# Altium PCB lighting_control_board.PcbDoc
Units mil, origin at the board's own origin, x right, y up, seen from the top; angles counter-clockwise.
Board outline 5435 x 1925 mil, 4 copper layers (Top Layer, Layer 1, Layer 2, Bottom Layer), stack 22.378 mil thick; 43 components, 29 nets, 207 pads, 19 vias.
Unrouted connection lines stored in the file: 30.
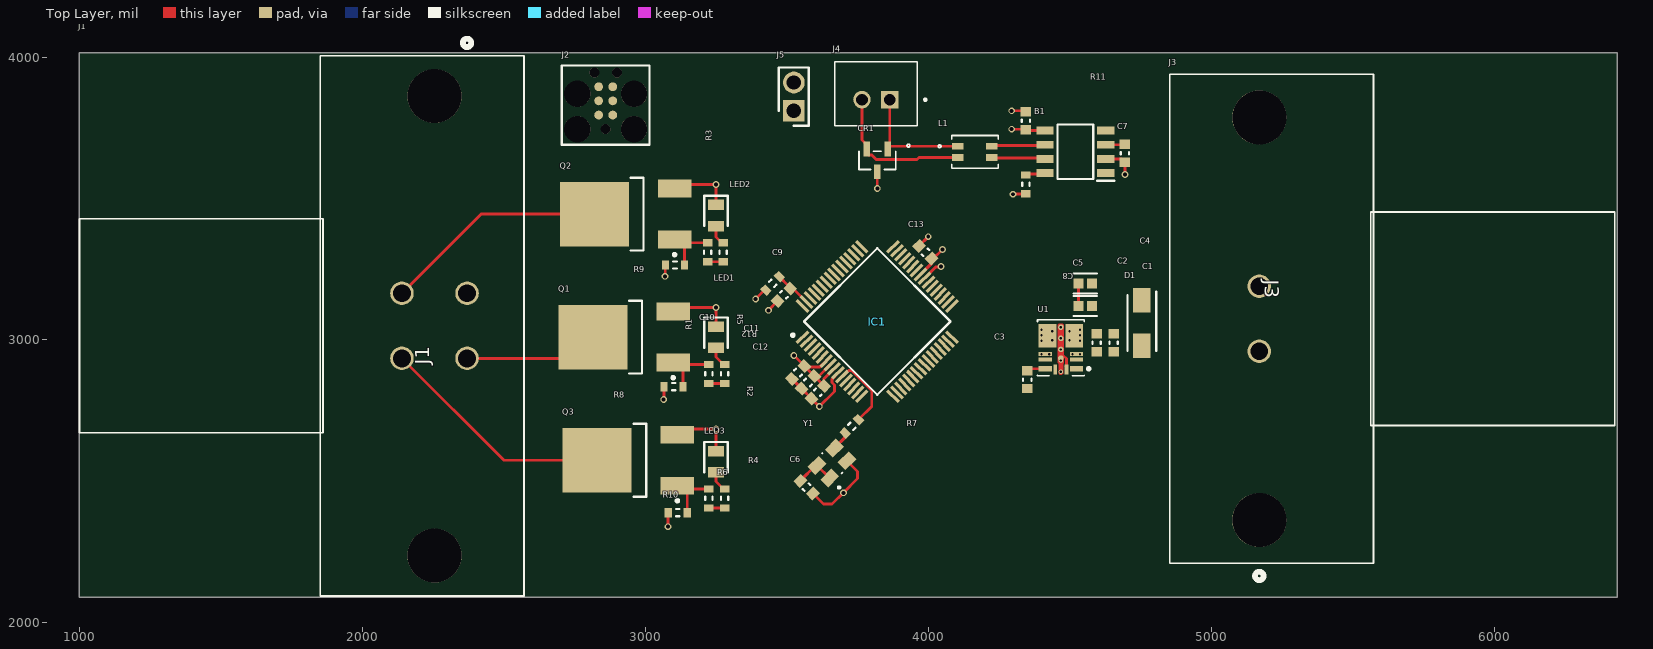
[diagram p0: Top Layer view]
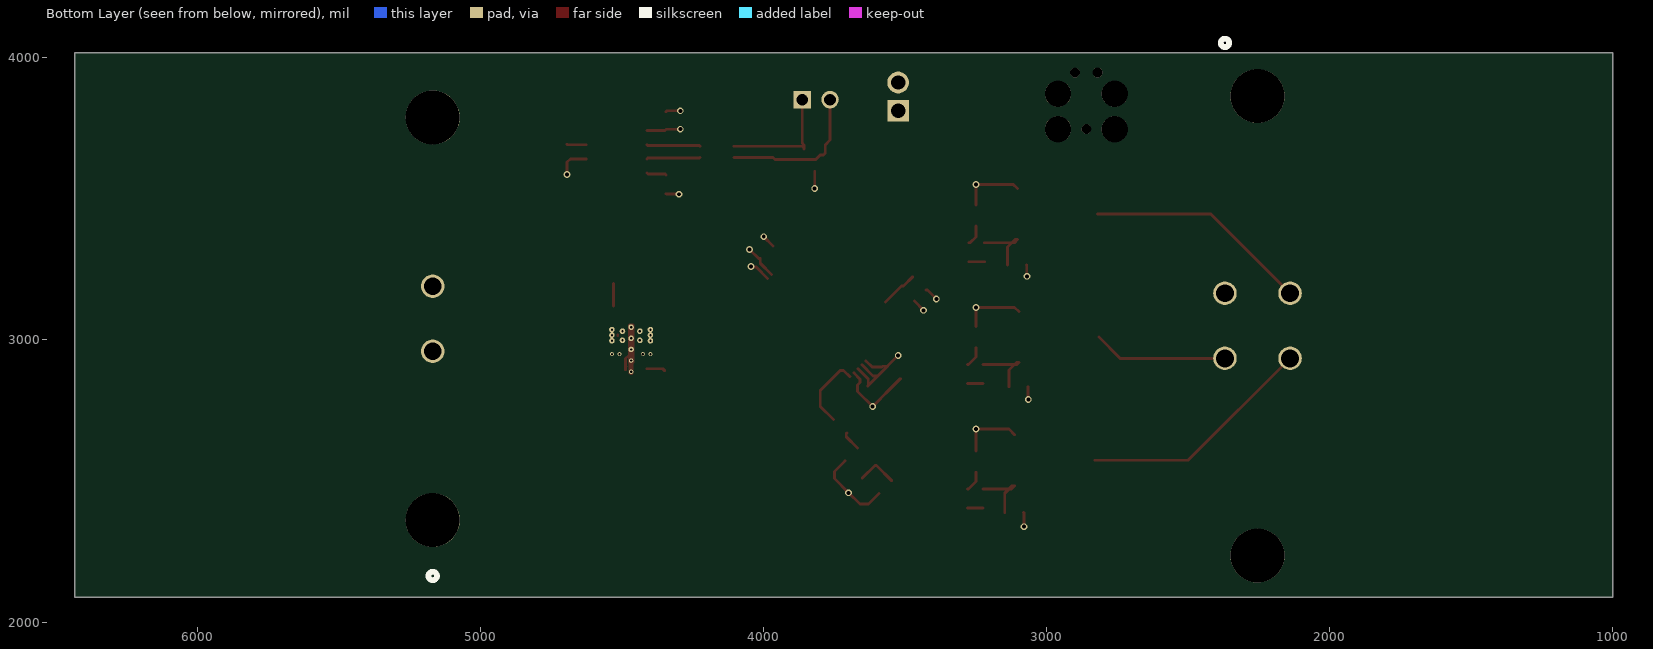
[diagram p1: Bottom Layer view, seen from below]
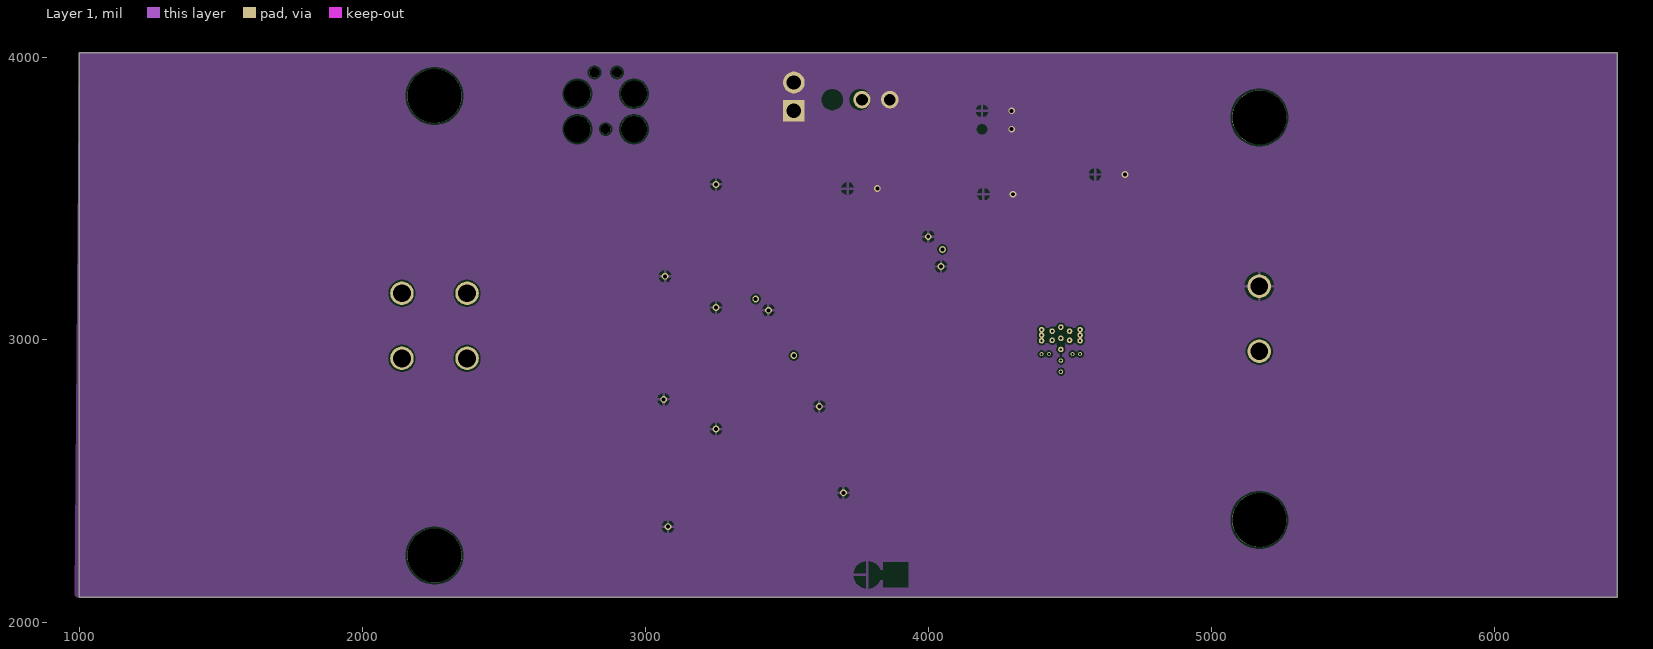
[diagram p2: Layer 1]
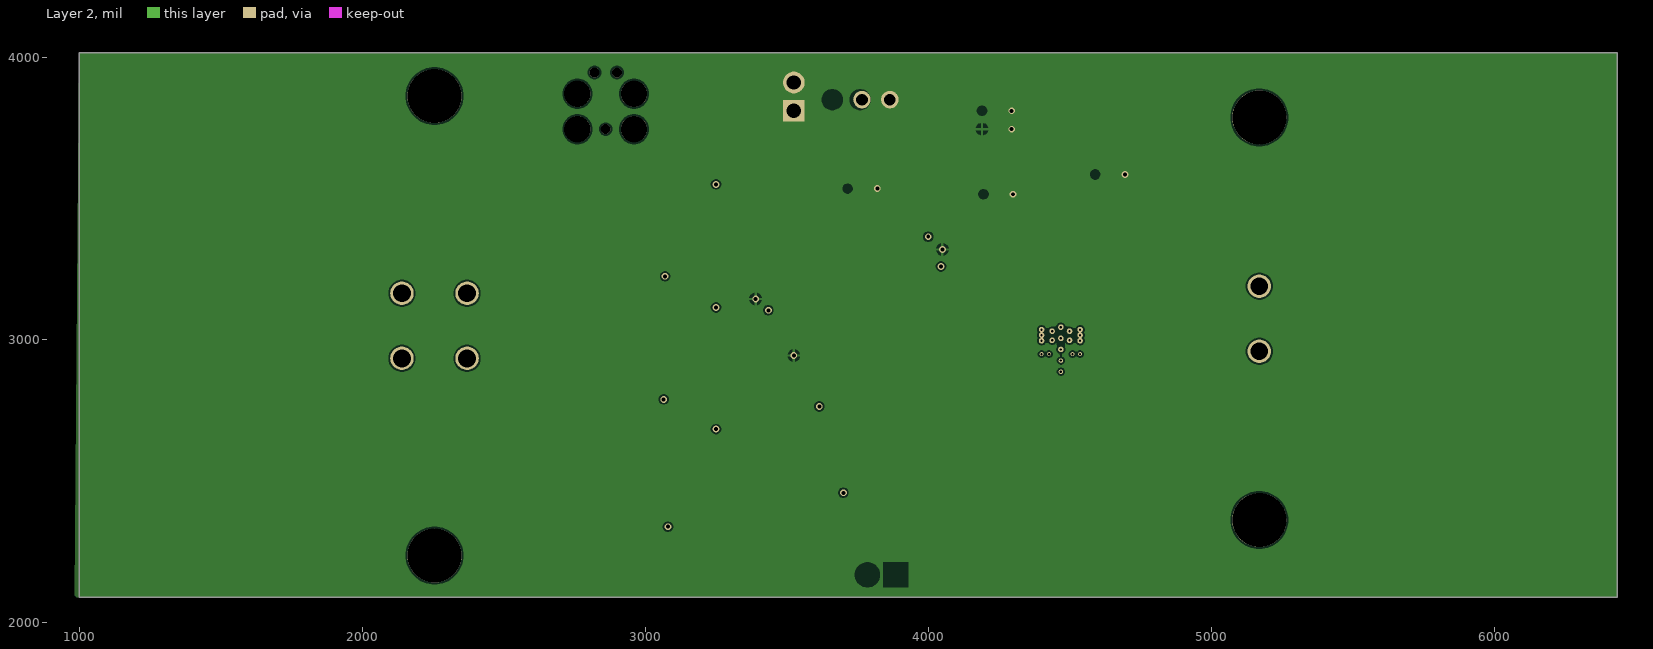
[diagram p3: Layer 2]
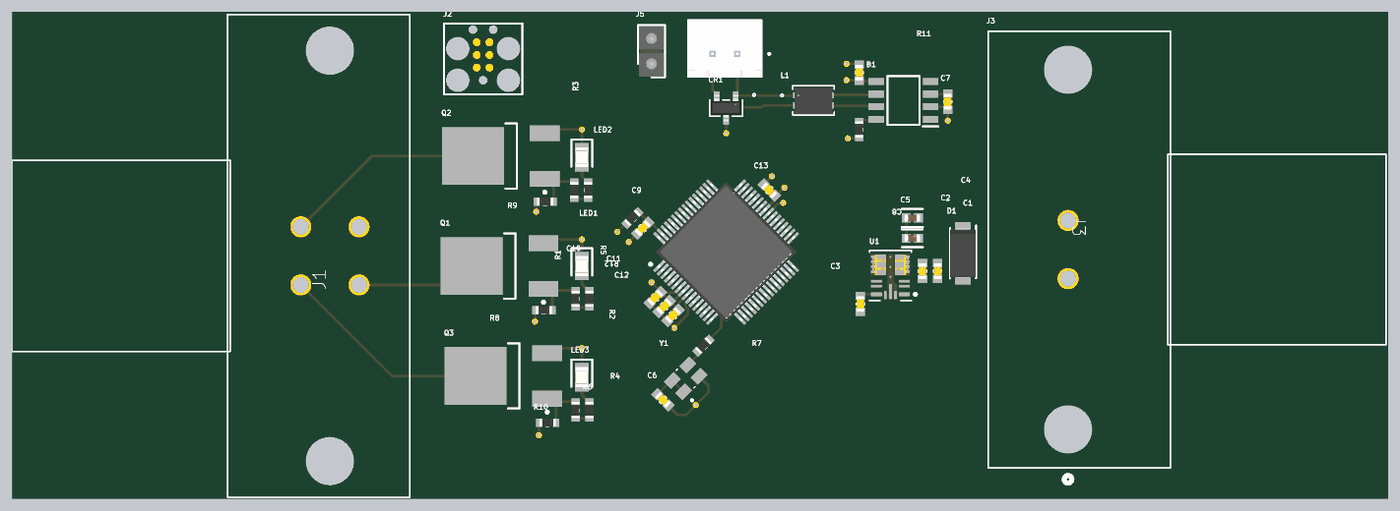
[diagram p4: 3D render of the assembled board from above, using the file's embedded part models]

## Layer stack, top to bottom
Top Solder: solder mask 0.4, Solder Resist, Dk 3.5
Top Layer: signal copper 1.4
Dielectric 2: prepreg 2.8, PP-006, Dk 4.1
Layer 1: signal copper 0.689
Dielectric 1: dielectric 12.6, FR-4, Dk 4.8
Layer 2: signal copper 0.689
Dielectric 3: prepreg 2.8, PP-006, Dk 4.1
Bottom Layer: signal copper 1.4
Bottom Solder: solder mask 0.4, Solder Resist, Dk 3.5

## Board outline
1000,2090 6435,2090 6435,4015 1000,4015

## Design rules (kind name [scope] priority, off if disabled: settings)
BoardOutlineClearance [All] p1: gap=0 ignorepadtopadclearanceinfootprint=FALSE
Clearance [All] p1: gap=6 ignorepadtopadclearanceinfootprint=FALSE
PolygonConnect [All] p1: connectstyle=Relief reliefconductorwidth=10 reliefentries=4 polygonreliefangle="90 Angle" airgapwidth=10
RoutingVias [All] p1: holewidth=14 width=24 viastyle="Through Hole" minholewidth=10 minwidth=20 maxholewidth=28 maxwidth=50
SolderMaskExpansion [All] p1: expansion=0 istentingtop=FALSE
SupplyNets "Schematic Supply Nets_5" [InNet('FAULT_GND')] p1: voltage=0.000
SupplyNets "Schematic Supply Nets_4" [InNet('+3V3')] p2: voltage=0.000
SupplyNets "Schematic Supply Nets_3" [InNet('+5V')] p3: voltage=0.000
SupplyNets "Schematic Supply Nets_2" [InNet('GND')] p4: voltage=0.000
SupplyNets "Schematic Supply Nets_1" [InNet('RTS_GND')] p5: voltage=0.000
SupplyNets "Schematic Supply Nets" [InNet('LTS_GND')] p6: voltage=0.000
Width [All] p1: maxlimit=10 minlimit=10 preferedwidth=10
30 further rules are at their usual default settings.

## Components (designator, comment, footprint, x,y, rotation, side; value= is the part's Value field where it differs from the comment)
B1 "TJA1044VT_3Z" SOIC127P600X175-8N 4520,3665 r180 top
C1 "4.7 uF" CAP_0603 4595,2990 r270 top
C2 "100 nF" CAP_0603 4655,2990 r270 top
C3 "1 uF" CAP_0603 4350,2860 r90 top
C4 "22 uF" FP-GRM188-0_2-IPC_C 4555,3120 r0 top
C5 "22 uF" FP-GRM188-0_2-IPC_C 4555,3200 r0 top
C6 "100 nF" CAP_0603 3570,2480 r315 top
C7 "100 nF" CAP_0603 4695,3660 r90 top
C8 "100 nF" CAP_0603 4345,3775 r270 top
C9 "100 nF" CAP_0603 3490,3160 r225 top
C10 "100 nF" CAP_0603 3540,2885 r225 top
C11 "100 nF" CAP_0603 3575,2850 r225 top
C12 "100 nF" CAP_0603 3610,2815 r225 top
C13 "100 nF" CAP_0603 3990,3310 r135 top
CR1 "ESD2CAN24DBZRQ1" SOT-23_DBZ_TEX 3820,3635 r180 top
D1 "SMAJ5.0A" DIOM5026X229N 4755,3060 r270 top
IC1 "FS32K142HAT0MLHT" QFP50P1200X1200X160-64N 3820,3065 r45 top
J1 "194270032" CONN_SD-19427-020_MOL 2370,3165 r90 top
J2 "Tag-Connect" TC2030-MCP 2860,3745 r90 top
J3 "194270040" CONN_SD-19427-018_MOL 5170,2960 r270 top
J4 "B2B-XH-A(LF)(SN)" JST_B2B-XH-A(LF)(SN) 3815,3870 r0 top
J5 "710-61300211121" HDRV2W110P0X254_1X2_508X254X854P 3525,3810 r90 top
L1 "Choke" ACT1210_TDK 4165,3665 r0 top
LED1 "Green" LEDC2012X90N 3250,3010 r270 top
LED2 "Green" LEDC2012X90N 3250,3440 r270 top
LED3 "White" LEDC2012X90N 3250,2570 r270 top
Q1 "NTD24N06LT4G" ONSC-DPAK-3-369C-01_V 2925.24,3010 r180 top
Q2 "NTD24N06LT4G" ONSC-DPAK-3-369C-01_V 2930.24,3445 r180 top
Q3 "NTD24N06LT4G" ONSC-DPAK-3-369C-01_V 2940.24,2575 r180 top
R1 "100Ω" RES_0603 3225,2880 r90 top
R2 "1KΩ" RES_0603 3280,2880 r270 top
R3 "100Ω" RES_0603 3220,3310 r90 top
R4 "100Ω" RES_0603 3225,2440 r90 top
R5 "1KΩ" RES_0603 3275,3310 r270 top
R6 "1KΩ" RES_0603 3280,2440 r270 top
R7 "22Ω" RES_0603 3730,2695 r45 top
R8 "10KΩ" RES_0603 3100,2835 r0 top
R9 "10KΩ" RES_0603 3105,3265 r0 top
R10 "10KΩ" RES_0603 3115,2390 r0 top
R11 "10KΩ" RES_0603 4345,3550 r90 top
R12 "10KΩ" RES_0603 3450,3200 r225 top
U1 "TPSM33620S5QRDNRQ1" RDN0011B-MFG 4468.66,2975.59 r180 top
Y1 "ASEAIG-40.000MHZ-C-S-T" XTAL_ASEAIG-40.000MHZ-C-S-T 3660,2565 r135 top

## Footprints (in the part's own frame and the unit in brackets; to place one, negate y for a bottom-side part, rotate by r counter-clockwise, add the part's x,y. Pads: shape width x height; smd on the part's side, far side on the other; paste and mask are expansions set on the pad)
ACT1210_TDK [mil]
  rect 41x24 smd paste+0 mask+0: 1(-60.04,19.68) 2(-60.04,-19.68) 3(60.04,-19.68) 4(60.04,19.68)
  silkscreen extent -130,-58 82,58, body extent -77,-53 77,53, height 98
CAP_0603 [mm] "0603 Generic Capacitor"
  rect 0.85x0.95 smd: 1(-0.8,0) 2(0.8,0)
  silkscreen extent -0.1,-0.38 0.1,0.38, body extent -0.8,-0.4 0.8,0.4, height 0.8
CONN_SD-19427-018_MOL [mil]
  round 83 hole 63 paste-99999 mask+0: 1(0,0) 2(-230,0)
  round 191 hole 191 unplated paste-99999 mask+0: 3(-826.5,0) 4(596.5,0)
  silkscreen extent -979,-316 809,1256
CONN_SD-19427-020_MOL [mil]
  round 83 hole 63 paste-99999 mask+0: 1(0,0) 2(-230,0) 3(0,230) 4(-230,230)
  round 191 hole 191 unplated paste-99999 mask+0: 5(-927,115) 6(697,115)
  silkscreen extent -1070,-201 900,1370
DIOM5026X229N [mm]
  rect 2.2x1.55 smd: 1(-2.05,0) 2(2.05,0)
  silkscreen extent -2.83,-1.3 2.52,1.3, body extent -2.52,-1.3 2.52,1.3, height 2.29
FP-GRM188-0_2-IPC_C [mil]
  rect 35.63x35.68 smd paste+0 mask+0: 1(-23.64,0) 2(23.64,0)
  silkscreen extent -41,-35 41,35, body extent -45,-24 45,24, height 10
HDRV2W110P0X254_1X2_508X254X854P [mm]
  rect 1.95x1.95 hole 1.3: 1(0,0)
  round 1.95 hole 1.3: 2(2.54,0)
  silkscreen extent -1.35,-1.35 3.89,1.35, body extent -1.27,-1.27 3.81,1.27, height 8.54
JST_B2B-XH-A(LF)(SN) [mm]
  rect 1.575x1.575 / inner round 1.575 / far side rect 1.575x1.575 hole 1.05: 1(1.25,-0.525)
  round 1.575 hole 1.05: 2(-1.25,-0.525)
  silkscreen extent -3.7,-2.88 4.54,2.88, body extent -3.7,-2.88 3.7,2.88, height 7
LEDC2012X90N [mm]
  rect 0.95x1.4 smd: 1(-0.95,0) 2(0.95,0)
  silkscreen extent -1.78,-1.05 0.95,1.05, body extent -1,-0.62 1,0.63, height 0.82
ONSC-DPAK-3-369C-01_V [mm] "DPAK, 3-Leads, Body 6.54x6.095mm, Pitch 2.29mm"
  rect 3x1.6 smd: 1(-4.4,2.29) 3(-4.4,-2.29)
  rect 6.2x5.8 smd: 4(2.8,0)
  silkscreen extent -4.53,-3.27 -0.45,3.76, body extent -1.6,-3.27 4.49,3.27, height 2.38
QFP50P1200X1200X160-64N [mm]
  rect 1.475x0.3 smd: 1(-5.738,3.75) 2(-5.738,3.25) 3(-5.738,2.75) 4(-5.738,2.25) 5(-5.738,1.75) 6(-5.738,1.25) 7(-5.738,0.75) 8(-5.738,0.25) 9(-5.738,-0.25) 10(-5.738,-0.75) 11(-5.738,-1.25) 12(-5.738,-1.75) 13(-5.738,-2.25) 14(-5.738,-2.75) 15(-5.738,-3.25) 16(-5.738,-3.75) 33(5.738,-3.75) 34(5.738,-3.25) 35(5.738,-2.75) 36(5.738,-2.25) 37(5.738,-1.75) 38(5.738,-1.25) 39(5.738,-0.75) 40(5.738,-0.25) 41(5.738,0.25) 42(5.738,0.75) 43(5.738,1.25) 44(5.738,1.75) 45(5.738,2.25) 46(5.738,2.75) 47(5.738,3.25) 48(5.738,3.75)
  rect 0.3x1.475 smd: 17(-3.75,-5.738) 18(-3.25,-5.738) 19(-2.75,-5.738) 20(-2.25,-5.738) 21(-1.75,-5.738) 22(-1.25,-5.738) 23(-0.75,-5.738) 24(-0.25,-5.738) 25(0.25,-5.738) 26(0.75,-5.738) 27(1.25,-5.738) 28(1.75,-5.738) 29(2.25,-5.738) 30(2.75,-5.738) 31(3.25,-5.738) 32(3.75,-5.738) 49(3.75,5.738) 50(3.25,5.738) 51(2.75,5.738) 52(2.25,5.738) 53(1.75,5.738) 54(1.25,5.738) 55(0.75,5.738) 56(0.25,5.738) 57(-0.25,5.738) 58(-0.75,5.738) 59(-1.25,5.738) 60(-1.75,5.738) 61(-2.25,5.738) 62(-2.75,5.738) 63(-3.25,5.738) 64(-3.75,5.738)
  silkscreen extent -6.35,-4.65 4.65,4.65, body extent -6,-6 6,6, height 1.6
RDN0011B-MFG [mm]
  rect 1.2x0.475 smd paste-0.587 mask-0.584: 1(-1.4,1.962) 8(1.4,1.962)
  rect 1.2x0.35 smd paste-0.587 mask-0.584: 2(-1.4,1.15) 3(-1.4,0.65) 6(1.4,0.65) 7(1.4,1.15)
  rect 1.6x2.15 smd paste-1.062 mask-1.067: 4(-1.2,-1) 5(1.2,-1)
  rect 0.35x0.9 smd paste-0.437 mask-0.432: 9(0.5,2.05) 11(-0.5,2.05)
  round 0.504 smd paste-0.239 mask-0.241: 10(0,1.005)
  round 0.35 hole 0.203 paste-2539.97 mask-0.165: 12(-1.05,0.65) 13(-1.73,0.65) 24(1.05,0.65) 25(1.73,0.65)
  round 0.5 hole 0.203 paste-2539.97 mask-0.241: 14(-0.78,-1.41) 15(-0.78,-0.59) 16(-1.73,-1.55) 17(-1.73,-1.05) 18(-1.73,-0.55) 21(0,0.23) 22(0,-0.77) 23(0,-1.77) 26(0.78,-0.59) 27(0.78,-1.41) 28(1.73,-0.55) 29(1.73,-1.05) 30(1.73,-1.55)
  round 0.4 hole 0.203 paste-2539.97 mask-0.191: 19(0,2.23) 20(0,1.23)
  Top Layer region: -0.2,1.515 -0.2,2.4 -0.1,2.5 0.1,2.5 0.2,2.4 0.2,1.515 0.24,1.475 0.24,1.475 0.28,1.435 0.28,-1.975 0.18,-2.075 -0.18,-2.075 -0.28,-1.975 -0.28,1.435 -0.24,1.475 -0.24,1.475
  silkscreen extent -2.63,-2.42 2.1,2.6
RES_0603 [mm] "0603 Generic Resistor"
  rect 0.65x0.85 smd: 1(-0.85,0) 2(0.85,0)
  silkscreen extent -0.15,-0.33 0.15,0.33, body extent -0.8,-0.4 0.8,0.4, height 0.45
SOIC127P600X175-8N [mm]
  rect 1.55x0.7 smd: 1(-2.725,1.905) 2(-2.725,0.635) 3(-2.725,-0.635) 4(-2.725,-1.905) 5(2.725,-1.905) 6(2.725,-0.635) 7(2.725,0.635) 8(2.725,1.905)
  silkscreen extent -3.5,-2.45 1.6,2.61
SOT-23_DBZ_TEX [mil]
  rect 22.36x51.56 smd paste+0 mask+0: 1(-37.4,-40) 2(37.4,-40) 3(0,40)
  silkscreen extent -115,-57 65,33, body extent -60,-52 60,52, height 44
TC2030-MCP [mil]
  round 31 smd paste-99999: 1(50,-25) 2(50,25) 3(100,-25) 4(100,25) 5(150,-25) 6(150,25)
  round 34 hole 35 unplated: A(0,0) B(200,40) C(200,-40)
  round 92 hole 93 unplated: D(0,-100) E(125,-100) F(0,100) G(125,100)
  silkscreen extent -55,-155 225,155
XTAL_ASEAIG-40.000MHZ-C-S-T [mm]
  rect 1x1.4 smd: 1(-0.8,1.1) 2(-0.8,-1.1) 3(0.8,-1.1) 4(0.8,1.1)
  silkscreen extent -2.1,-0.08 1.25,1.2

## Part data
B1: "CAN Interface IC HS-CAN Transceivers High-speed CAN transceiver with Standby mode", Manufacturer_Name=NXP, Manufacturer_Part_Number=TJA1044VT/3Z, Mouser Part Number=771-TJA1044VT/3Z, Datasheet Link=http://www.nxp.com/docs/en/data-sheet/TJA1044V.pdf, Geometry.Height=1.75mm, Mouser Price/Stock=https://www.mouser.co.uk/ProductDetail/NXP-Semiconductors/TJA1044VT-3Z?qs=wUXugUrL1qwONZrxXTzMPQ%3D%3D
C1: library part "4.7 uF Capacitor, 0603", "Multilayer Ceramic Capacitors MLCC - SMD/SMT KGM15BR71H224JT NEW GLOBAL PN 50V 0.22uF A 581-KGM15BR71H224JT", Manufacturer 1="KYOCERA AVX", Manufacturer Part Number 1=06033D475KAT2A, MPN=581-06033D475KAT2A, Package=0603, Tolerance=10%, Voltage="25 V", Design Item ID="4.7 uF Capacitor, 0603", Library Ref=Capacitor_BASE, Supplier 1=Mouser
C2 C6 C7 C8 C9 C10 C11 C12 C13: library part "100 nF Capacitor, 0603", "Multilayer Ceramic Capacitors MLCC - SMD/SMT KGM15BR71H104JT NEW GLOBAL PN 50V 0.1uF A 581-KGM15BR71H104JT", Manufacturer 1="KYOCERA AVX", Manufacturer Part Number 1=06035C104JAT2A, MPN=581-06035C104JAT2A, Package=0603, Tolerance=5%, Voltage="50 V", Design Item ID="100 nF Capacitor, 0603", Library Ref=Capacitor_BASE, Supplier 1=Mouser
C3: library part "1 uF Capacitor, 0603", "Multilayer Ceramic Capacitors MLCC - SMD/SMT KGM15BR71H224JT NEW GLOBAL PN 50V 0.22uF A 581-KGM15BR71H224JT", Manufacturer 1="KYOCERA AVX", Manufacturer Part Number 1=06033C105KAT2A, MPN=581-06033C105KAT2A, Package=0603, Tolerance=10%, Voltage="25 V", Design Item ID="1 uF Capacitor, 0603", Library Ref=Capacitor_BASE, Supplier 1=Mouser
C4 C5: library part CMP-2000-06337-3, "Chip Multilayer Ceramic Capacitors for General Purpose, 0603, 22uF, X5R, 15%, 20%, 10V", Capacitance=22uF, Case Code (Imperial)=0603, Case Code (Metric)=1608, Dielectric=X5R, Max Operating Temperature=85°C, Min Operating Temperature=-55°C, Package Quantity=4000, Tolerance=20%, Voltage Rating=10V, Case/Package=0603, Depth=0.8mm, Height=0.8mm, Lead Free="Lead Free", Length=1.6mm, Material=Ceramic, Mount="Surface Mount", Packaging="Tape and Reel", REACH SVHC="No SVHC", Termination=SMD/SMT, Thickness=0.039inch, Voltage Rating (DC)=10V, Weight=0.000222oz, Width=0.8mm
CR1: "Automotive, dual, 3-pF, Â±24-V, Â±30-kV ESD protection diode for in-vehicle networks 3-SOT-23 -55 to 150", Manufacturer_Name="Texas Instruments", Copyright="Copyright (C) 2026 Ultra Librarian. All rights reserved.", Manufacturer_Part_Number=ESD2CAN24DBZRQ1, RefDes=RefDes, Type=Type
D1: "TVS +5 V rail", Manufacturer_Name=LITTELFUSE, Mouser Part Number=576-SMAJ5.0A, Arrow Part Number=SMAJ5.0A, Arrow Price/Stock=https://www.arrow.com/en/products/smaj5-0a_12/littelfuse.html?utm_currency=USD&region=nac, Datasheet Link=https://www.littelfuse.com/~/media/electronics/datasheets/tvs_diodes/littelfuse_tvs_diode_smaj_datasheet.pdf.pdf, Height=2.29mm, Manufacturer_Part_Number=SMAJ5.0A, Mouser Price/Stock=https://www.mouser.co.uk/ProductDetail/Littelfuse/SMAJ5.0A?qs=2VFNtWizgicfetZVA4gWHA%3D%3D
IC1: "Integrated Circuit", Manufacturer_Name=NXP, Mouser Part Number=771-FS32K142HAT0MLHT, Arrow Part Number=FS32K142HAT0MLHT, Arrow Price/Stock=https://www.arrow.com/en/products/fs32k142hat0mlht/nxp-semiconductors?region=nac, Datasheet Link=https://datasheet.datasheetarchive.com/originals/distributors/DKDS42/DSANUWW0047967.pdf, Height=1.6mm, Manufacturer_Part_Number=FS32K142HAT0MLHT, Mouser Price/Stock=https://www.mouser.co.uk/ProductDetail/NXP-Semiconductors/FS32K142HAT0MLHT?qs=W0yvOO0ixfHOt6NwcnDRUQ%3D%3D
J1: "5.84mm Pitch MX150L Right-Angle PCB Header, Dual Row, without PCB Flange, Tin Plated, 4 Circuits", Manufacturer_Name="Molex Connector Corporation", Copyright="Copyright (C) 2026 Ultra Librarian. All rights reserved.", Manufacturer_Part_Number=194270032, RefDes=RefDes, Type=Type
J2: "Tag-Connect Programming Connector"
J3: "5.84mm Pitch MX150L Right-Angle PCB Header, Single Row, without PCB Flange, Tin Plated, 2 Circuits", Manufacturer_Name="Molex Connector Corporation", Copyright="Copyright (C) 2026 Ultra Librarian. All rights reserved.", Manufacturer_Part_Number=194270040, RefDes=RefDes, Type=Type
J4: "Connector Header Through Hole 2 position 0.098 (2.50mm)", Package=None, Check_prices=https://www.snapeda.com/parts/B2B-XH-A(LF)(SN)/JST/view-part/?ref=eda, MF="JST Sales", MP=B2B-XH-A(LF)(SN), SnapEDA_Link=https://www.snapeda.com/parts/B2B-XH-A(LF)(SN)/JST/view-part/?ref=snap
J5: library part 61300211121, "2-Pin Header", Manufacturer_Name="Wurth Elektronik", Datasheet Link=https://www.we-online.com/components/products/datasheet/61300211121.pdf, Manufacturer_Part_Number=61300211121, Supplier 1=Mouser, Supplier Part Number 1=710-61300211121
L1: library part ACT1210D-101-2P-TL00, "Description", Manufacturer_Name=TDK, Copyright="Copyright (C) 2025 Ultra Librarian. All rights reserved.", Manufacturer_Part_Number=ACT1210D-101-2P-TL00, Type="Common Mode Chokes"
LED1 LED2: library part HSMW-C170-U0000_2, "LED Green", Manufacturer_Name="Avago Technologies", Manufacturer_Part_Number=HSMW-C170-U0000, Supplier Part Number 1=630-HSMQ-C170-T0000, Datasheet Link=https://componentsearchengine.com/Datasheets/2/HSMW-C170-U0000.pdf, Supplier 1=Mouser
LED3: library part HSMW-C170-U0000_3, "LED White", Manufacturer_Name="Avago Technologies", Manufacturer_Part_Number=HSMW-C170-U0000, Supplier Part Number 1=630-HSMW-C170-U0000, Datasheet Link=https://componentsearchengine.com/Datasheets/2/HSMW-C170-U0000.pdf, Supplier 1=Mouser
Q1 Q2 Q3: library part CMP-1058-00417-1, "Power MOSFET, 24 A, 60 V, Logic Level, N-Channel, 3-Pin DPAK, Pb-Free, Tape and Reel", Manufacturer="On Semiconductor", Package Type=DPAK-3, Channel Polarity="N Channel", Ciss Typ (pF)=814, ComponentLink1Description="Manufacturer URL", ComponentLink1URL=http://www.onsemi.com/, ComponentLink2Description=Datasheet, ComponentLink2URL=http://www.onsemi.cn/pub_link/Collateral/NTD24N06L-D.PDF, ComponentLink3Description="Package Specification", ComponentLink3URL=http://www.onsemi.cn/pub_link/Collateral/369C.PDF, Configuration=Single, Coss Typ (pF)=258, Crss Typ (pF)=80, DatasheetVersion="Rev. 3", Mounting Technology="Surface Mount", PackageDescription="3-Pin Flange Mount, Body 6.54 x 6.095 mm, Pitch 2.29 mm", PackageReference=DPAK-3-369C-01, PackageVersion="Rev. E, 02/2014", Packing="Tape and Reel", PartNumber=NTD24N06LT4G, Qrr Typ (nC)=84, RoHS=Pb-Free, V(BR)DSS Min (V)=60, VGS(th) Max (V)=2
R1 R3 R4: library part "100 Ohm Resistor", "Thick Film Resistors - SMD General Purpose Chip Resistor 0603, 100Ohms, 1%, 1/10W", Manufacturer 1=YAGEO, Manufacturer Part Number 1=RC0603FR-07100RL, MPN=603-RC0603FR-07100RL, Package=0603, Power=0.1W, Tolerance=0.01, Design Item ID="100 Ohm Resistor", Library Ref=Resistor_BASE, Supplier 1=Mouser
R2 R5 R6: library part "1 KOhm Resistor", "Thick Film Resistors - SMD General Purpose Chip Resistor 0603, 1kOhms, 1%, 1/10W", Manufacturer 1=YAGEO, Manufacturer Part Number 1=RC0603FR-071KL, MPN=603-RC0603FR-071KL, Package=0603, Power=0.1W, Tolerance=0.01, Design Item ID="1 KOhm Resistor", Library Ref=Resistor_BASE, Supplier 1=Mouser
R7: library part "22 Ohm Resistor", "Thick Film Resistors - SMD General Purpose Chip Resistor 0603, 22Ohms, 1%, 1/10W", Manufacturer 1=YAGEO, Manufacturer Part Number 1=RC0603FR-0722RL, MPN=603-RC0603FR-0722RL, Package=0603, Power=0.1W, Tolerance=0.01, Design Item ID="22 Ohm Resistor", Library Ref=Resistor_BASE, Supplier 1=Mouser
R8 R9 R10 R11 R12: library part "10 KOhm Resistor", "Thick Film Resistors - SMD General Purpose Chip Resistor 0603, 10kOhms, 1%, 1/10W", Manufacturer 1=YAGEO, Manufacturer Part Number 1=RC0603FR-0710KL, MPN=603-RC0603FR-0710KL, Package=0603, Power=0.1W, Tolerance=0.01, Design Item ID="10 KOhm Resistor", Library Ref=Resistor_BASE, Supplier 1=Mouser
U1: "Automotive, 3V to 36V input, 2A synchronous buck module 11-QFN-FCMOD -40 to 150", Manufacturer_Name="Texas Instruments", Copyright="Copyright (C) 2026 Ultra Librarian. All rights reserved.", Manufacturer_Part_Number=TPSM33620S5QRDNRQ1, RefDes=RefDes, Type=TYPE
Y1: "40 MHz XO (Standard) CMOS Oscillator 3.3V Enable/Disable 4-SMD, No Lead", Package=None, Check_prices=https://www.snapeda.com/parts/ASEAIG-40.000MHZ-C-S-T/Abracon+LLC/view-part/?ref=eda, MF="Abracon LLC", MP=ASEAIG-40.000MHZ-C-S-T, SnapEDA_Link=https://www.snapeda.com/parts/ASEAIG-40.000MHZ-C-S-T/Abracon+LLC/view-part/?ref=snap

## Via types
v1: diameter 24, hole 14, Top Layer to Bottom Layer, 19 vias

## Nets (pads, with @x,y where several pads share a name; then routed paths per layer and width w, separated by ;. In a path a pad name is that pad's centre, name@x,y a point inside that pad or via, vN(x,y) a via of type N, cw(c..) or ccw(c..) an arc to the next point about the centre after c; other vN are vias at no path point)
+3V3: B1.5 C4.1 C5.1 C6.1 C8.2 C10.1 C11.1 C12.1 C13.1 IC1.7 IC1.8 IC1.9 IC1.41 R12.2 U1.4 U1.9 Y1.1 Y1.4 | length 909.5
  Top Layer w10: v1(3390,3145) 3421.34,3176.34 R12.2 ; v1(3525,2945) 3562.27,2907.73 C10.1 ; C6.1 3602.11,2556.65 Y1.4 Y1.1 ; IC1.7 3638.1,2926.14 3616.31,2904.35 3581.78,2904.35 3578.86,2907.27 C10.1 ; IC1.8 3613.35,2872.27 C11.1 ; IC1.9 3630.88,2861.96 3630.88,2838.66 C12.1 C11.1 ; IC1.41 4012.27,3271.19 C13.1 4017.73,3287.73 v1(4050,3320) ; v1(4295,3745) 4343.5,3745 C8.2 4348.5,3740 B1.5 ; U1.4 U1.4@4515.91,3018.16 ; C4.1 C5.1 ; C10.1 C11.1
+5V: B1.3 C1.2 C2.2 C7.2 D1.2 J3.1 U1.2 U1.3 | length 68.3
  Top Layer w10: B1.3 4693.5,3690 C7.2
CAN0_RX: B1.4 IC1.34
CAN0_TX: B1.1 IC1.33
CANH: CR1.1 J4.1 L1.1 | length 430.8
  Top Layer w10: J4.1 3864.21,3696.41 3857.4,3689.6 CR1.1 3857.4,3678.5 3863.58,3684.68 L1.1
CANL: CR1.2 J4.2 L1.2 | length 530.4
  Top Layer w10: J4.2 3765.79,3706.41 3782.6,3689.6 3782.6,3660.4 3788.78,3654.22 3800.33,3654.22 3816.33,3638.22 3960.66,3638.22 3967.76,3645.32 L1.2
EXTAL: R7.1 Y1.3 | length 71
  Top Layer w10: Y1.3 3708.55,2658.1 3708.55,2669.12 R7.1
Fault: Q3.1 R4.2 R10.2 | length 230.6
  Top Layer w10: R10.2 3148.46,2458.35 3121.97,2484.84 Q3.1 3124.84,2473.46 R4.2
FAULT_GND: J1.4 Q3.4 | length 839.1
  Top Layer w10: J1.4 2500,2575 Q3.4
GND: B1.2 C1.1 C2.1 C3.1 C4.2 C5.2 C6.2 C7.1 C8.1 C9.2 C10.2 C11.2 C12.2 C13.2 CR1.3 D1.1 IC1.10 IC1.40 J2.1 J2.5 J3.2 J5.2 LED1.1 LED2.1 LED3.1 Q1.3 Q2.3 Q3.3 R8.1 R9.1 R10.1 R11.1 U1.10 U1.11 Y1.2 | length 1890.8
  Top Layer w10: v1(3065,2790) 3065.77,2790.77 3065.77,2834.23 R8.1 ; v1(3070,3225) 3070.77,3225.77 3070.77,3264.23 R9.1 ; v1(3080,2340) 3080.77,2340.77 3080.77,2389.23 R10.1 ; Q1.3 3113.31,3115 v1(3250,3115) LED1.1 ; Q2.3 3118.31,3550 v1(3250,3550) LED2.1 ; Q3.3 3133.31,2685 v1(3250,2685) LED3.1 ; v1(3435,3105) C9.2 ; C10.2@3517.27,2862.73 C10.2 C11.2 C12.2 3587.73,2792.27 v1(3615,2765) 3668.33,2818.33 3668.33,2840.58 3659.35,2849.55 3659.35,2861.31 3681.14,2883.1 IC1.10 ; C6.2 3630,2420 3660,2420 v1(3700,2460) 3750,2510 3750,2535 3712.89,2572.11 Y1.2 ; v1(3820,3535) CR1.3 ; C13.2 3967.73,3332.73 v1(4000,3365) ; IC1.40 4026.31,3257.39 4042.39,3257.39 v1(4045,3260) ; v1(4295,3810) 4341.5,3810 C8.1 ; v1(4300,3515) 4300.77,3515.77 4344.23,3515.77 R11.1 ; 4476.83,2945.69 4488.35,2934.17 4488.35,2907.6 4487.42,2906.67 4486.46,2906.67 4488.35,2904.78 U1.11 ; B1.2 4683.5,3640 C7.1 v1(4695,3585)
LTS: Q2.1 R3.2 R9.2 | length 230.6
  Top Layer w10: R9.2 3138.46,3328.35 3111.97,3354.84 Q2.1 3114.84,3343.46 R3.2
LTS_GND: J1.3 Q2.4 | length 796
  Top Layer w10: J1.3 2420,3445 Q2.4
NetB1_6: B1.6 L1.4 | length 189.9
  Top Layer w10: L1.4 4227.7,3687.34 4410.06,3687.34 B1.6
NetB1_7: B1.7 L1.3 | length 189.9
  Top Layer w10: L1.3 4227.7,3642.66 4410.06,3642.66 B1.7
NetC3_2: C3.2 U1.8 | length 66.4
  Top Layer w10: C3.2 4356.85,2898.35 U1.8
NetIC1_11: IC1.11 R7.2 | length 266
  Top Layer w10: IC1.11 3696.34,2870.46 3718.13,2892.25 3729.89,2892.25 3800.36,2821.78 3800.36,2765.36 R7.2
NetIC1_46: IC1.46 R4.1 R6.2 | length 55
  Top Layer w10: R4.1 R6.2
NetIC1_47: IC1.47 R3.1 R5.2 | length 55
  Top Layer w10: R3.1 R5.2
NetIC1_48: IC1.48 R1.1 R2.2 | length 55
  Top Layer w10: R1.1 R2.2
NetLED1_2: LED1.2 R2.1 | length 73.9
  Top Layer w10: LED1.2 3250,2939.53 3276.06,2913.46 R2.1
NetLED2_2: LED2.2 R5.1 | length 71.8
  Top Layer w10: LED2.2 3250,3364.53 3271.06,3343.46 R5.1
NetLED3_2: LED3.2 R6.1 | length 73.9
  Top Layer w10: LED3.2 3250,2499.53 3276.06,2473.46 R6.1
Reset_b: C9.1 IC1.63 J2.3 J5.1 R12.1 | length 133.2
  Top Layer w10: R12.1 3506.16,3191.16 3512.88,3191.16 IC1.63
RTS: Q1.1 R1.2 R8.2 | length 233.5
  Top Layer w10: R8.2 3133.46,2893.35 3106.97,2919.84 Q1.1 3104.84,2913.46 R1.2
RTS_GND: J1.2 Q1.4 | length 476.1
  Top Layer w10: J1.2 2740,2935 Q1.4
STB: B1.8 IC1.35 R11.2 | length 70.4
  Top Layer w10: R11.2 4348.27,3586.73 4409.45,3586.73 B1.8
SWCLK: IC1.62 J2.4
SWDIO: IC1.64 J2.2
SWO: IC1.61 J2.6
pads on no net: IC1.1 IC1.2 IC1.3 IC1.4 IC1.5 IC1.6 IC1.12 IC1.13 IC1.14 IC1.15 IC1.16 IC1.17 IC1.18 IC1.19 IC1.20 IC1.21 IC1.22 IC1.23 IC1.24 IC1.25 IC1.26 IC1.27 IC1.28 IC1.29 IC1.30 IC1.31 IC1.32 IC1.36 IC1.37 IC1.38 IC1.39 IC1.42 IC1.43 IC1.44 IC1.45 IC1.49 IC1.50 IC1.51 IC1.52 IC1.53 IC1.54 IC1.55 IC1.56 IC1.57 IC1.58 IC1.59 IC1.60 J1.1 J1.5 J1.6 J2.A J2.B J2.C J2.D J2.E J2.F J2.G J3.3 J3.4 U1.1 U1.5 U1.6 U1.7 U1.12 U1.13 U1.14 U1.15 U1.16 U1.17 U1.18 U1.19 U1.20 U1.21 U1.22 U1.23 U1.24 U1.25 U1.26 U1.27 U1.28 U1.29 U1.30

## Polygon pours and split planes (outlines as drawn)
GND on Layer 1 "GND_L02_P000" (solid, pour order 0): 1000,4015 6435,4015 6435,2090 983.62,2090
+3V3 on Layer 2 "+3V3_L03_P001" (solid, pour order 1): 1000,4015 6435,4015 6435,2090 983.62,2090